# Altium PCB PCB1.PcbDoc
Units mil, origin at the board's own origin, x right, y up, seen from the top; angles counter-clockwise.
Board outline 6000 x 4000 mil, 2 copper layers (Top Layer, Bottom Layer); 53 components, 99 nets, 837 pads, 0 vias.
Unrouted connection lines stored in the file: 465.
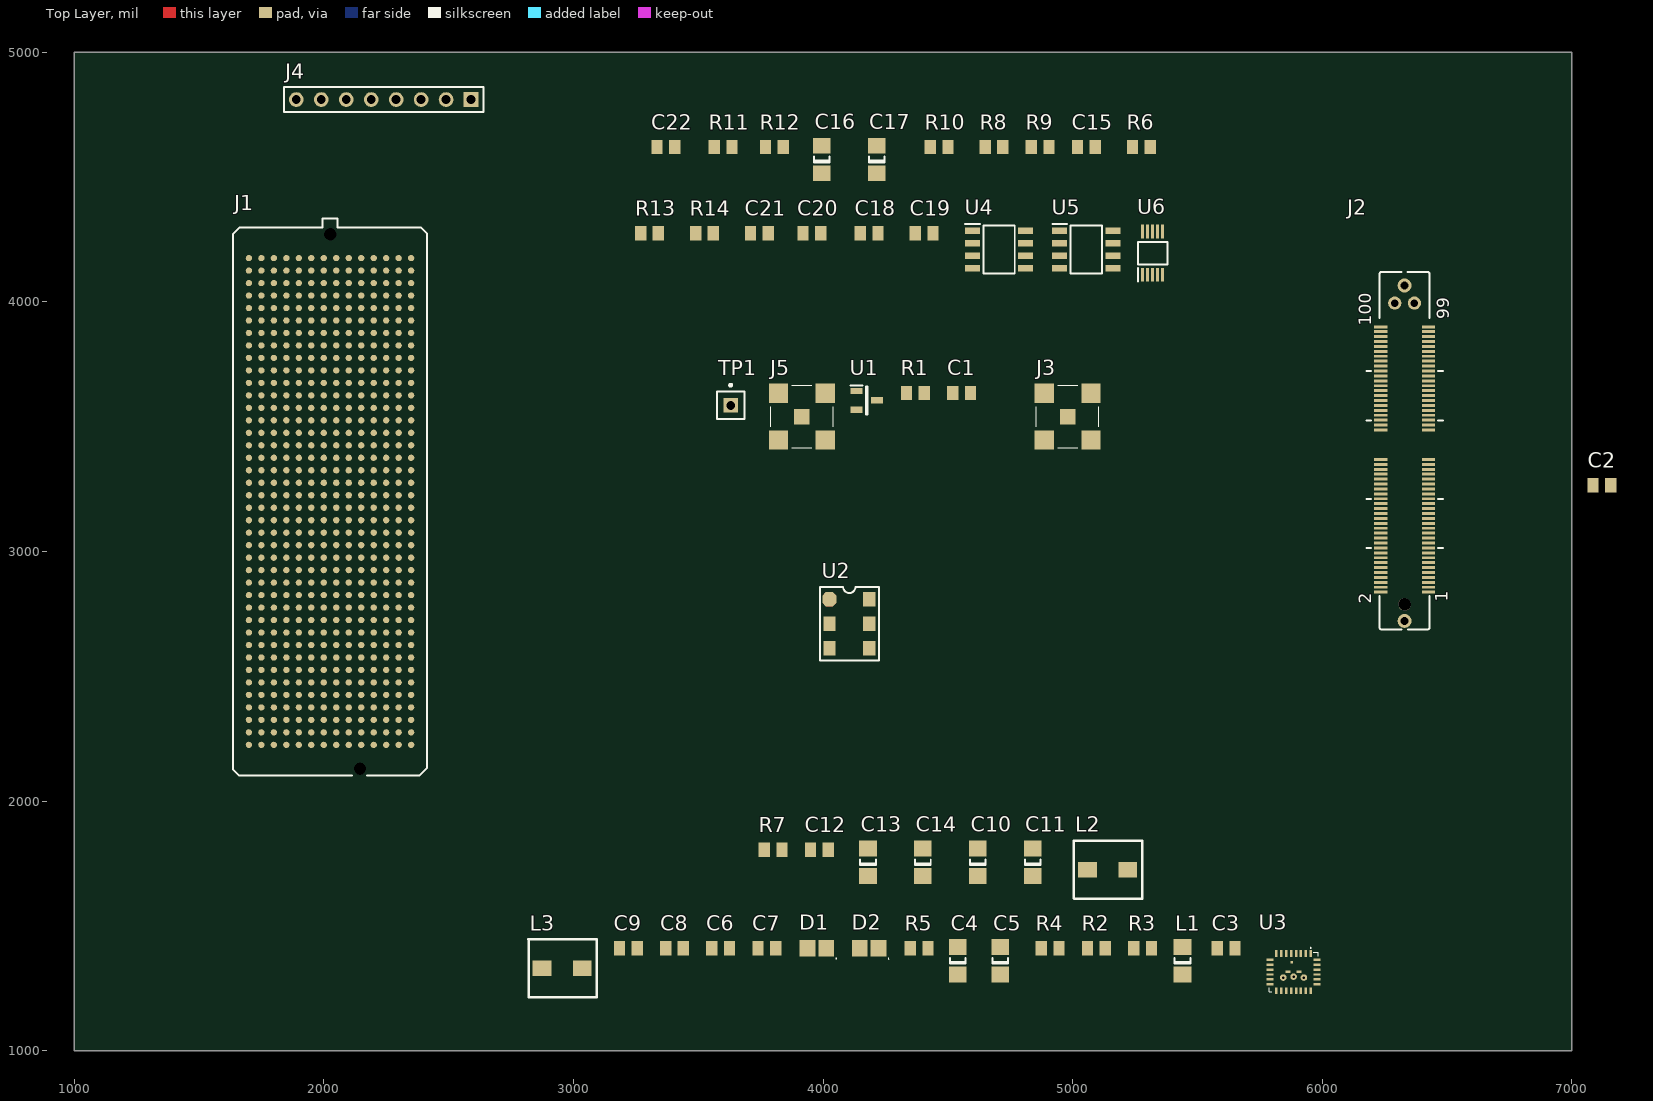
[diagram p0: Top Layer view]
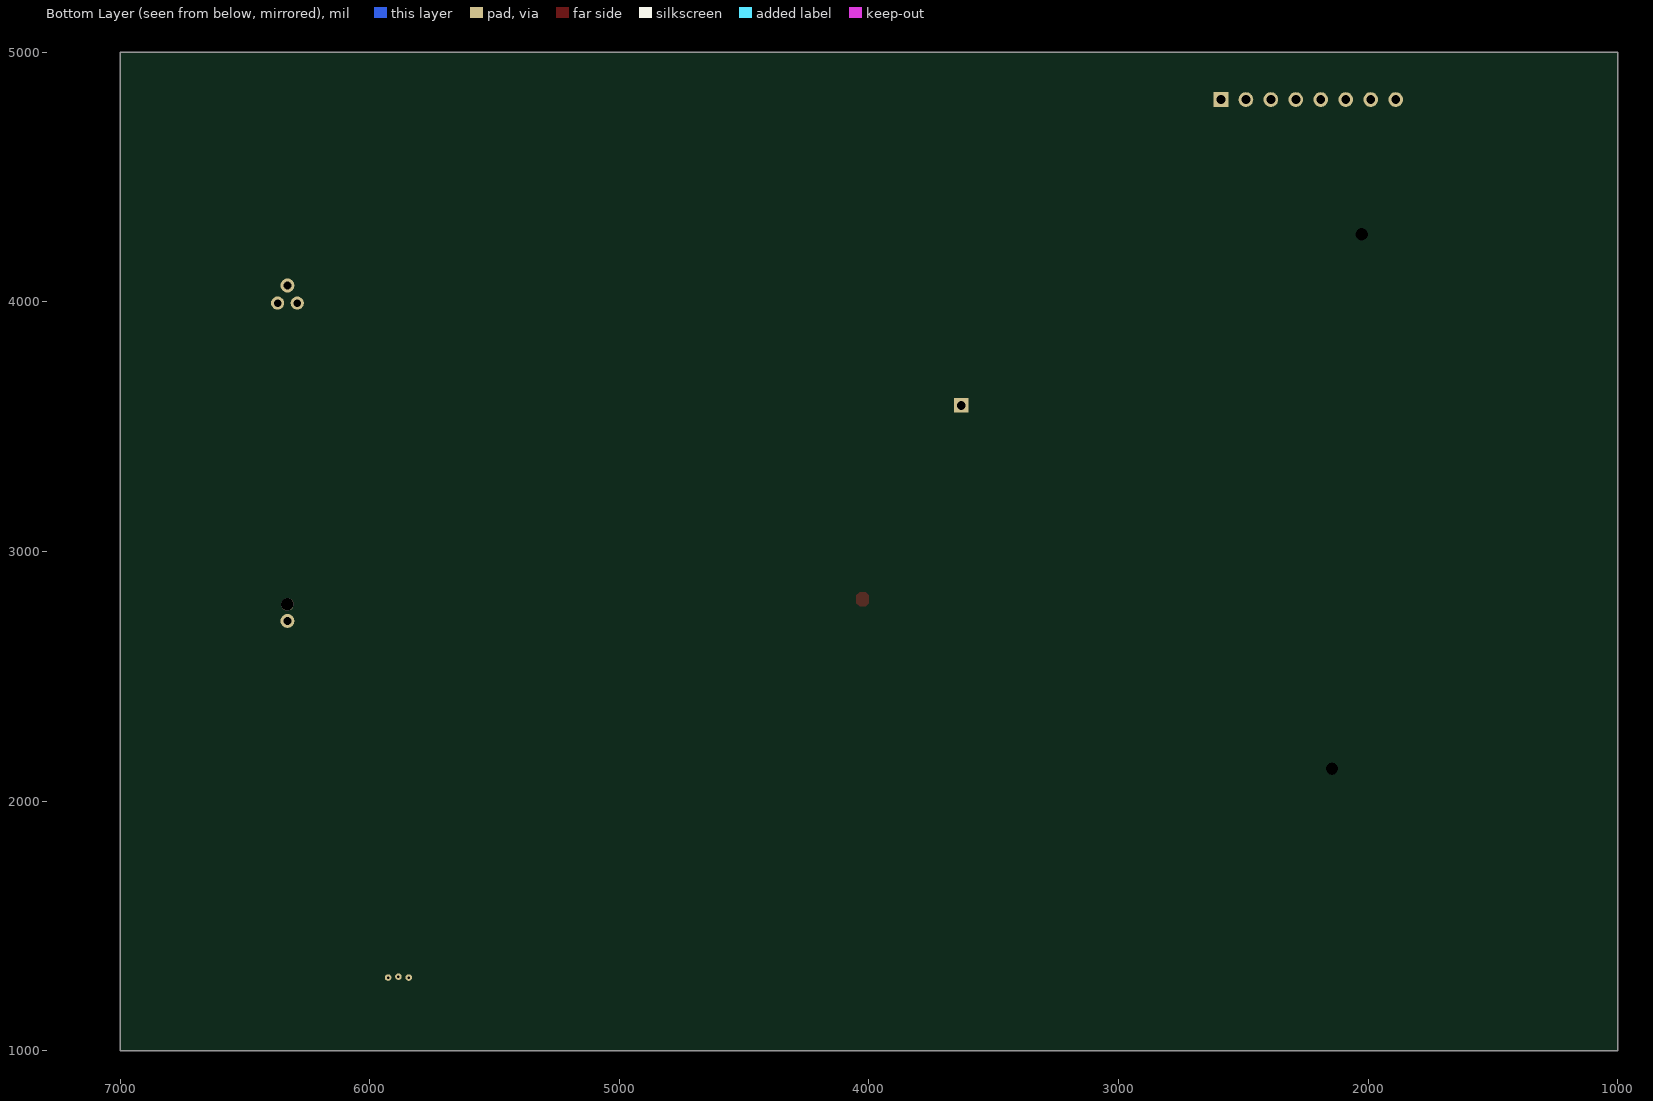
[diagram p1: Bottom Layer view, seen from below]

## Layer stack, top to bottom
Top Solder: solder mask 0.4, Solder Resist, Dk 3.5
Top Layer: signal copper 1.4
Dielectric 1: dielectric 12.6, FR-4, Dk 4.8
Bottom Layer: signal copper 1.4
Bottom Solder: solder mask 0.4, Solder Resist, Dk 3.5

## Board outline
1000,1000 7000,1000 7000,5000 1000,5000

## Design rules (kind name [scope] priority, off if disabled: settings)
Clearance [All] p1: gap=10 ignorepadtopadclearanceinfootprint=FALSE
DiffPairsRouting [All] p1: maxlimit=10 minlimit=10 mostfreqgap=10 toplayer_minwidth=15 toplayer_maxwidth=15 toplayer_prefwidth=15 bottomlayer_minwidth=15 bottomlayer_maxwidth=15 bottomlayer_prefwidth=15 maxuncoupledlength=500
PolygonConnect [All] p1: connectstyle=Relief reliefconductorwidth=10 reliefentries=4 polygonreliefangle="90 Angle" airgapwidth=10
RoutingVias [All] p1: holewidth=28 width=50 viastyle="Through Hole" minholewidth=28 minwidth=50 maxholewidth=28 maxwidth=50
SolderMaskExpansion [All] p1: expansion=4 istentingtop=FALSE
SupplyNets "Schematic Supply Nets_4" [InNet('3V3')] p1: voltage=0.000
SupplyNets "Schematic Supply Nets_3" [InNet('2V5')] p2: voltage=0.000
SupplyNets "Schematic Supply Nets_2" [InNet('GND')] p3: voltage=0.000
SupplyNets "Schematic Supply Nets_1" [InNet('1V5')] p4: voltage=0.000
SupplyNets "Schematic Supply Nets" [InNet('VADJ_FMC')] p5: voltage=0.000
Width [All] p1: maxlimit=10 minlimit=10 preferedwidth=10
29 further rules are at their usual default settings.

## Classes and differential pairs
component class TP4_Compact_FMC_Sht2: C3 C4 C5 C6 C7 C8 C9 C10 C11 C12 C13 C14 C15 C16 C17 C18 C19 C20 C21 C22 D1 D2 J2 L1 L2 L3 R2 R3 R4 R5 R6 R7 R8 R9 R10 R11 R12 R13 R14 U3 U4 U5 U6
component class TP4_Compact_FMC_Sht1: C1 C2 J1 J3 J4 J5 R1 TP1 U1 U2
differential pair TPX4_RefClk: +TPX4_RefClk_P -TPX4_RefClk_N
differential pair TO_SYNC_B: +TO_SYNC_B_P -TO_SYNC_B_N
differential pair TESTOUT_T: +TESTOUT_T_P -TESTOUT_T_N
differential pair TESTOUT_B: +TESTOUT_B_P -TESTOUT_B_N
differential pair SHUTTER_B: +SHUTTER_B_P -SHUTTER_B_N
differential pair SERIAL_OUT5_T: +SERIAL_OUT5_T_P -SERIAL_OUT5_T_N
differential pair SERIAL_OUT5_B: +SERIAL_OUT5_B_P -SERIAL_OUT5_B_N
differential pair SERIAL_OUT4_T: +SERIAL_OUT4_T_P -SERIAL_OUT4_T_N
differential pair SERIAL_OUT4_B: +SERIAL_OUT4_B_P -SERIAL_OUT4_B_N
differential pair SERIAL_OUT3_T: +SERIAL_OUT3_T_P -SERIAL_OUT3_T_N
differential pair SERIAL_OUT3_B: +SERIAL_OUT3_B_P -SERIAL_OUT3_B_N
differential pair SERIAL_OUT2_T: +SERIAL_OUT2_T_P -SERIAL_OUT2_T_N
differential pair SERIAL_OUT2_B: +SERIAL_OUT2_B_P -SERIAL_OUT2_B_N
differential pair SERIAL_OUT1_T: +SERIAL_OUT1_T_P -SERIAL_OUT1_T_N
differential pair SERIAL_OUT1_B: +SERIAL_OUT1_B_P -SERIAL_OUT1_B_N
differential pair SERIAL_OUT0_T: +SERIAL_OUT0_T_P -SERIAL_OUT0_T_N
differential pair SERIAL_OUT0_B: +SERIAL_OUT0_B_P -SERIAL_OUT0_B_N
differential pair SC_DATA_OUT_B: +SC_DATA_OUT_B_P -SC_DATA_OUT_B_N
differential pair SC_DATA_IN_B: +SC_DATA_IN_B_P -SC_DATA_IN_B_N
differential pair SC_CLOCK_OUT_B: +SC_CLOCK_OUT_B_P -SC_CLOCK_OUT_B_N
differential pair SC_CLOCK_IN_B: +SC_CLOCK_IN_B_P -SC_CLOCK_IN_B_N
differential pair RESET_B: +RESET_B_P -RESET_B_N
differential pair MGTREF: +MGTREF_P -MGTREF_N

## Components (designator, comment, footprint, x,y, rotation, side; value= is the part's Value field where it differs from the comment)
C1 "Cap" CAP0805 4555,3635 r0 top value="10uF 16v 0805"
C2 "Cap" CAP0805 7120,3265 r0 top value="10uF 16v 0805"
C3 "Cap" CAP0805 5615,1410 r0 top value="10uF 16v 0805"
C4 "Cap" 1206 4540,1360 r90 top value="47uF 25v 1206"
C5 "Cap" 1206 4710,1360 r90 top value="47uF 25v 1206"
C6 "Cap" CAP0805 3590,1410 r0 top value=DNP
C7 "Cap" CAP0805 3775,1410 r0 top value=DNP
C8 "Cap" CAP0805 3405,1410 r0 top value="0.1uF 16v 0805"
C9 "Cap" CAP0805 3220,1410 r0 top value="0.1uF 16v 0805"
C10 "Cap" 1206 4620,1755 r90 top value="47uF 25v 1206"
C11 "Cap" 1206 4840,1755 r90 top value="47uF 25v 1206"
C12 "Cap" CAP0805 3985,1805 r0 top value="22pF 0805"
C13 "Cap" 1206 4180,1755 r90 top value="47uF 25v 1206"
C14 "Cap" 1206 4400,1755 r90 top value="47uF 25v 1206"
C15 "Cap" CAP0805 5055,4620 r0 top value="22pF 0805"
C16 "Cap" 1206 3995,4570 r90 top value="47uF 25v 1206"
C17 "Cap" 1206 4215,4570 r90 top value="47uF 25v 1206"
C18 "Cap" CAP0805 4185,4275 r0 top value="0.1uF 16v 0805"
C19 "Cap" CAP0805 4405,4275 r0 top value="0.1uF 16v 0805"
C20 "Cap" CAP0805 3955,4275 r0 top value="0.1uF 16v 0805"
C21 "Cap" CAP0805 3745,4275 r0 top value="0.1uF 16v 0805"
C22 "Cap" CAP0805 3370,4620 r0 top value="0.1uF 16v 0805"
D1 "LED_GRN 0603" LED0603 3975,1410 r0 top
D2 "LED_GRN 0603" LED0603 4185,1410 r0 top
J1 "ASP_184330_01" SAMTEC_ASP_184330_01 2025,3200 r90 top
J2 "MEC5-050-01-L-DV-W1-K-TR" MEC5-050-01-L-DV-W1-K-TR 6329.65,3368.33 r90 top
J3 "SMA_V" SMA_Vert 4980,3540 r0 top
J4 "Header 8" HDR1X8 2590,4810 r180 top
J5 "SMA_V" SMA_Vert 3915,3540 r0 top
L1 "Inductor Iron" 1206 5440,1360 r90 top value="bead 1206"
L2 "Wurth 744316033" Inductor_5.6mm 5140,1725 r0 top value=330nH
L3 "Wurth 744316033" Inductor_5.6mm 2955,1330 r0 top value=330nH
R1 "Res" CAP0805 4370,3635 r0 top value=zero
R2 "Res1" CAP0805 5095,1410 r0 top value=15k
R3 "Res1" CAP0805 5280,1410 r0 top value=15k
R4 "Res1" CAP0805 4910,1410 r0 top value=150k
R5 "Res1" CAP0805 4385,1410 r0 top value=zero
R6 "Res1" CAP0805 5275,4620 r0 top value=45.3k
R7 "Res1" CAP0805 3800,1805 r0 top value=15k
R8 "Res1" CAP0805 4685,4620 r0 top value=10k
R9 "Res1" CAP0805 4870,4620 r0 top value=10k
R10 "Res1" CAP0805 4465,4620 r0 top value=zero
R11 "Res" CAP0805 3600,4620 r0 top value=".02 1W 1206"
R12 "Res" CAP0805 3805,4620 r0 top value=".02 1W 1206"
R13 "Res1" CAP0805 3305,4275 r0 top value=zero
R14 "Res1" CAP0805 3525,4275 r0 top value=zero
TP1 "through-hole pad" Pin1 3630,3585 r0 top
U1 "MCP1700T-2502E_TT" SOT95P237X112-3N 4175,3605 r0 top
U2 "SIT9365AI-2E2-25E160.00" osc_7mm_5mm 4025.55,2808.43 r0 top
U3 "LTC3636EUFD#PBF" LTC3636EUFDPBF 5885,1315 r0 top
U4 "AD8202WYRZ" SOIC127P600X175-8N 4705,4210 r0 top
U5 "AD8202WYRZ" SOIC127P600X175-8N 5055,4210 r0 top
U6 "ADS1015LIDGSR" SOP50P490X110-10N 5320,4195 r90 top

## Footprints (in the part's own frame and the unit in brackets; to place one, negate y for a bottom-side part, rotate by r counter-clockwise, add the part's x,y. Pads: shape width x height; smd on the part's side, far side on the other; paste and mask are expansions set on the pad)
1206 [mm] "Chip Capacitor; Body 3.2 x 1.6 mm (LxW typ)"
  rect 1.6x1.8 smd: 1(-1.4,0) 2(1.4,0)
  silkscreen extent -0.3,-0.8 0.3,0.8
CAP0805 [mm]
  rect 1.15x1.45 smd: 1(-0.9,0) 2(0.9,0)
  body extent -1.08,-0.7 1.07,0.7, height 1
HDR1X8 [mm]
  rect 1.5x1.5 hole 0.9: 1(0,0)
  round 1.5 hole 0.9: 2(2.54,0) 3(5.08,0) 4(7.62,0) 5(10.16,0) 6(12.7,0) 7(15.24,0) 8(17.78,0)
  silkscreen extent -1.27,-1.27 19.05,1.27
Inductor_5.6mm [mm]
  rect 1.9x1.6 smd: 1(-2.05,0) 2(2.05,0)
  silkscreen extent -3.43,-2.95 3.51,2.95
LED0603 [mm]
  rect 1.6x1.65 smd: 1(-0.95,0) 2(0.95,0)
  silkscreen extent 1.91,-1.09 2.01,-0.99, body extent -1.35,-0.8 1.35,0.8, height 1
LTC3636EUFDPBF [mm]
  rect 0.25x0.7 smd: 1(1.75,1.9) 2(1.25,1.9) 3(0.75,1.9) 4(0.25,1.9) 5(-0.25,1.9) 6(-0.75,1.9) 7(-1.25,1.9) 8(-1.75,1.9) 15(-1.75,-1.9) 16(-1.25,-1.9) 17(-0.75,-1.9) 18(-0.25,-1.9) 19(0.25,-1.9) 20(0.75,-1.9) 21(1.25,-1.9) 22(1.75,-1.9)
  rect 0.7x0.25 smd: 9(-2.4,1.25) 10(-2.4,0.75) 11(-2.4,0.25) 12(-2.4,-0.25) 13(-2.4,-0.75) 14(-2.4,-1.25) 23(2.4,-1.25) 24(2.4,-0.75) 25(2.4,-0.25) 26(2.4,0.25) 27(2.4,0.75) 28(2.4,1.25)
  rect 0.23x0.28 smd: 29(-0.19,1)
  rect 0.53x0.25 smd: 30(0.565,0.03) 31(-0.565,0.03)
  round 0.667 hole 0.25: 32(0,-0.47) 33(1.05,-0.56) 34(-1.05,-0.56)
  silkscreen extent -2.5,-2 2.5,2.5, body extent -2.5,-2 2.5,2, height 0.9
MEC5-050-01-L-DV-W1-K-TR [mm]
  rect 0.3x1.35 smd mask+0: 1(-13.5,-2.425) 2(-13.5,2.425) 3(-13,-2.425) 4(-13,2.425) 5(-12.5,-2.425) 6(-12.5,2.425) 7(-12,-2.425) 8(-12,2.425) 9(-11.5,-2.425) 10(-11.5,2.425) 11(-11,-2.425) 12(-11,2.425) 13(-10.5,-2.425) 14(-10.5,2.425) 15(-10,-2.425) 16(-10,2.425) 17(-9.5,-2.425) 18(-9.5,2.425) 19(-9,-2.425) 20(-9,2.425) 21(-8.5,-2.425) 22(-8.5,2.425) 23(-8,-2.425) 24(-8,2.425) 25(-7.5,-2.425) 26(-7.5,2.425) 27(-7,-2.425) 28(-7,2.425) 29(-6.5,-2.425) 30(-6.5,2.425) 31(-6,-2.425) 32(-6,2.425) 33(-5.5,-2.425) 34(-5.5,2.425) 35(-5,-2.425) 36(-5,2.425) 37(-4.5,-2.425) 38(-4.5,2.425) 39(-4,-2.425) 40(-4,2.425) 41(-3.5,-2.425) 42(-3.5,2.425) 43(-3,-2.425) 44(-3,2.425) 45(-2.5,-2.425) 46(-2.5,2.425) 47(-2,-2.425) 48(-2,2.425) 49(-1.5,-2.425) 50(-1.5,2.425) 51(-1,-2.425) 52(-1,2.425) 53(-0.5,-2.425) 54(-0.5,2.425) 55(0,-2.425) 56(0,2.425) 57(3,-2.425) 58(3,2.425) 59(3.5,-2.425) 60(3.5,2.425) 61(4,-2.425) 62(4,2.425) 63(4.5,-2.425) 64(4.5,2.425) 65(5,-2.425) 66(5,2.425) 67(5.5,-2.425) 68(5.5,2.425) 69(6,-2.425) 70(6,2.425) 71(6.5,-2.425) 72(6.5,2.425) 73(7,-2.425) 74(7,2.425) 75(7.5,-2.425) 76(7.5,2.425) 77(8,-2.425) 78(8,2.425) 79(8.5,-2.425) 80(8.5,2.425) 81(9,-2.425) 82(9,2.425) 83(9.5,-2.425) 84(9.5,2.425) 85(10,-2.425) 86(10,2.425) 87(10.5,-2.425) 88(10.5,2.425) 89(11,-2.425) 90(11,2.425) 91(11.5,-2.425) 92(11.5,2.425) 93(12,-2.425) 94(12,2.425) 95(12.5,-2.425) 96(12.5,2.425) 97(13,-2.425) 98(13,2.425) 99(13.5,-2.425) 100(13.5,2.425)
  round 1.43 hole 0.83 mask+0: G1(-16.43,0) G4(17.7,0)
  round 1.35 hole 0.75 mask+0: G2(15.91,1) G3(15.91,-1)
  round 1.27 hole 1.27 unplated: ""(-14.75,0)
  silkscreen extent -17.3,-3.9 19.08,3.9
osc_7mm_5mm [mm]
  oct 1.45x1.45 smd: 1(0,0)
  rect 1.25x1.45 smd: 2(0,-2.5) 3(0,-5) 4(4.05,-5) 5(4.05,-2.5) 6(4.05,0)
  Top Layer region: -0.625,-0.412 -0.312,-0.725 0.312,-0.725 0.625,-0.412 0.625,0.412 0.312,0.725 -0.312,0.725 -0.625,0.412
  silkscreen extent -0.97,-6.25 5.05,1.25
Pin1 [mm]
  rect 1.5x1.5 hole 0.9: 1(0,0)
  silkscreen extent -1.4,-1.4 1.4,2.17
SAMTEC_ASP_184330_01 [mm]
  round 0.64 smd: A1(24.765,5.715) A2(23.495,5.715) A3(22.225,5.715) A4(20.955,5.715) A5(19.685,5.715) A6(18.415,5.715) A7(17.145,5.715) A8(15.875,5.715) A9(14.605,5.715) A10(13.335,5.715) A11(12.065,5.715) A12(10.795,5.715) A13(9.525,5.715) A14(8.255,5.715) A15(6.985,5.715) A16(5.715,5.715) A17(4.445,5.715) A18(3.175,5.715) A19(1.905,5.715) A20(0.635,5.715) A21(-0.635,5.715) A22(-1.905,5.715) A23(-3.175,5.715) A24(-4.445,5.715) A25(-5.715,5.715) A26(-6.985,5.715) A27(-8.255,5.715) A28(-9.525,5.715) A29(-10.795,5.715) A30(-12.065,5.715) A31(-13.335,5.715) A32(-14.605,5.715) A33(-15.875,5.715) A34(-17.145,5.715) A35(-18.415,5.715) A36(-19.685,5.715) A37(-20.955,5.715) A38(-22.225,5.715) A39(-23.495,5.715) A40(-24.765,5.715) B1(24.765,4.445) B2(23.495,4.445) B3(22.225,4.445) B4(20.955,4.445) B5(19.685,4.445) B6(18.415,4.445) B7(17.145,4.445) B8(15.875,4.445) B9(14.605,4.445) B10(13.335,4.445) B11(12.065,4.445) B12(10.795,4.445) B13(9.525,4.445) B14(8.255,4.445) B15(6.985,4.445) B16(5.715,4.445) B17(4.445,4.445) B18(3.175,4.445) B19(1.905,4.445) B20(0.635,4.445) B21(-0.635,4.445) B22(-1.905,4.445) B23(-3.175,4.445) B24(-4.445,4.445) B25(-5.715,4.445) B26(-6.985,4.445) B27(-8.255,4.445) B28(-9.525,4.445) B29(-10.795,4.445) B30(-12.065,4.445) B31(-13.335,4.445) B32(-14.605,4.445) B33(-15.875,4.445) B34(-17.145,4.445) B35(-18.415,4.445) B36(-19.685,4.445) B37(-20.955,4.445) B38(-22.225,4.445) B39(-23.495,4.445) B40(-24.765,4.445) C1(24.765,3.175) C2(23.495,3.175) C3(22.225,3.175) C4(20.955,3.175) C5(19.685,3.175) C6(18.415,3.175) C7(17.145,3.175) C8(15.875,3.175) C9(14.605,3.175) C10(13.335,3.175) C11(12.065,3.175) C12(10.795,3.175) C13(9.525,3.175) C14(8.255,3.175) C15(6.985,3.175) C16(5.715,3.175) C17(4.445,3.175) C18(3.175,3.175) C19(1.905,3.175) C20(0.635,3.175) C21(-0.635,3.175) C22(-1.905,3.175) C23(-3.175,3.175) C24(-4.445,3.175) C25(-5.715,3.175) C26(-6.985,3.175) C27(-8.255,3.175) C28(-9.525,3.175) C29(-10.795,3.175) C30(-12.065,3.175) C31(-13.335,3.175) C32(-14.605,3.175) C33(-15.875,3.175) C34(-17.145,3.175) C35(-18.415,3.175) C36(-19.685,3.175) C37(-20.955,3.175) C38(-22.225,3.175) C39(-23.495,3.175) C40(-24.765,3.175) D1(24.765,1.905) D2(23.495,1.905) D3(22.225,1.905) D4(20.955,1.905) D5(19.685,1.905) D6(18.415,1.905) D7(17.145,1.905) D8(15.875,1.905) D9(14.605,1.905) D10(13.335,1.905) D11(12.065,1.905) D12(10.795,1.905) D13(9.525,1.905) D14(8.255,1.905) D15(6.985,1.905) D16(5.715,1.905) D17(4.445,1.905) D18(3.175,1.905) D19(1.905,1.905) D20(0.635,1.905) D21(-0.635,1.905) D22(-1.905,1.905) D23(-3.175,1.905) D24(-4.445,1.905) D25(-5.715,1.905) D26(-6.985,1.905) D27(-8.255,1.905) D28(-9.525,1.905) D29(-10.795,1.905) D30(-12.065,1.905) D31(-13.335,1.905) D32(-14.605,1.905) D33(-15.875,1.905) D34(-17.145,1.905) D35(-18.415,1.905) D36(-19.685,1.905) D37(-20.955,1.905) D38(-22.225,1.905) D39(-23.495,1.905) D40(-24.765,1.905) E1(24.765,0.635) E2(23.495,0.635) E3(22.225,0.635) E4(20.955,0.635) E5(19.685,0.635) E6(18.415,0.635) E7(17.145,0.635) E8(15.875,0.635) E9(14.605,0.635) E10(13.335,0.635) E11(12.065,0.635) E12(10.795,0.635) E13(9.525,0.635) E14(8.255,0.635) E15(6.985,0.635) E16(5.715,0.635) E17(4.445,0.635) E18(3.175,0.635) E19(1.905,0.635) E20(0.635,0.635) E21(-0.635,0.635) E22(-1.905,0.635) E23(-3.175,0.635) E24(-4.445,0.635) E25(-5.715,0.635) E26(-6.985,0.635) E27(-8.255,0.635) E28(-9.525,0.635) E29(-10.795,0.635) E30(-12.065,0.635) E31(-13.335,0.635) E32(-14.605,0.635) E33(-15.875,0.635) E34(-17.145,0.635) E35(-18.415,0.635) E36(-19.685,0.635) E37(-20.955,0.635) E38(-22.225,0.635) E39(-23.495,0.635) E40(-24.765,0.635) F1(24.765,-0.635) F2(23.495,-0.635) F3(22.225,-0.635) F4(20.955,-0.635) F5(19.685,-0.635) F6(18.415,-0.635) F7(17.145,-0.635) F8(15.875,-0.635) F9(14.605,-0.635) F10(13.335,-0.635) F11(12.065,-0.635) F12(10.795,-0.635) F13(9.525,-0.635) F14(8.255,-0.635) F15(6.985,-0.635) F16(5.715,-0.635) F17(4.445,-0.635) F18(3.175,-0.635) F19(1.905,-0.635) F20(0.635,-0.635) F21(-0.635,-0.635) F22(-1.905,-0.635) F23(-3.175,-0.635) F24(-4.445,-0.635) F25(-5.715,-0.635) F26(-6.985,-0.635) F27(-8.255,-0.635) F28(-9.525,-0.635) F29(-10.795,-0.635) F30(-12.065,-0.635) F31(-13.335,-0.635) F32(-14.605,-0.635) F33(-15.875,-0.635) F34(-17.145,-0.635) F35(-18.415,-0.635) F36(-19.685,-0.635) F37(-20.955,-0.635) F38(-22.225,-0.635) F39(-23.495,-0.635) F40(-24.765,-0.635) G1(24.765,-1.905) G2(23.495,-1.905) G3(22.225,-1.905) G4(20.955,-1.905) G5(19.685,-1.905) G6(18.415,-1.905) G7(17.145,-1.905) G8(15.875,-1.905) G9(14.605,-1.905) G10(13.335,-1.905) G11(12.065,-1.905) G12(10.795,-1.905) G13(9.525,-1.905) G14(8.255,-1.905) G15(6.985,-1.905) G16(5.715,-1.905) G17(4.445,-1.905) G18(3.175,-1.905) G19(1.905,-1.905) G20(0.635,-1.905) G21(-0.635,-1.905) G22(-1.905,-1.905) G23(-3.175,-1.905) G24(-4.445,-1.905) G25(-5.715,-1.905) G26(-6.985,-1.905) G27(-8.255,-1.905) G28(-9.525,-1.905) G29(-10.795,-1.905) G30(-12.065,-1.905) G31(-13.335,-1.905) G32(-14.605,-1.905) G33(-15.875,-1.905) G34(-17.145,-1.905) G35(-18.415,-1.905) G36(-19.685,-1.905) G37(-20.955,-1.905) G38(-22.225,-1.905) G39(-23.495,-1.905) G40(-24.765,-1.905) H1(24.765,-3.175) H2(23.495,-3.175) H3(22.225,-3.175) H4(20.955,-3.175) H5(19.685,-3.175) H6(18.415,-3.175) H7(17.145,-3.175) H8(15.875,-3.175) H9(14.605,-3.175) H10(13.335,-3.175) H11(12.065,-3.175) H12(10.795,-3.175) H13(9.525,-3.175) H14(8.255,-3.175) H15(6.985,-3.175) H16(5.715,-3.175) H17(4.445,-3.175) H18(3.175,-3.175) H19(1.905,-3.175) H20(0.635,-3.175) H21(-0.635,-3.175) H22(-1.905,-3.175) H23(-3.175,-3.175) H24(-4.445,-3.175) H25(-5.715,-3.175) H26(-6.985,-3.175) H27(-8.255,-3.175) H28(-9.525,-3.175) H29(-10.795,-3.175) H30(-12.065,-3.175) H31(-13.335,-3.175) H32(-14.605,-3.175) H33(-15.875,-3.175) H34(-17.145,-3.175) H35(-18.415,-3.175) H36(-19.685,-3.175) H37(-20.955,-3.175) H38(-22.225,-3.175) H39(-23.495,-3.175) H40(-24.765,-3.175) J1(24.765,-4.445) J2(23.495,-4.445) J3(22.225,-4.445) J4(20.955,-4.445) J5(19.685,-4.445) J6(18.415,-4.445) J7(17.145,-4.445) J8(15.875,-4.445) J9(14.605,-4.445) J10(13.335,-4.445) J11(12.065,-4.445) J12(10.795,-4.445) J13(9.525,-4.445) J14(8.255,-4.445) J15(6.985,-4.445) J16(5.715,-4.445) J17(4.445,-4.445) J18(3.175,-4.445) J19(1.905,-4.445) J20(0.635,-4.445) J21(-0.635,-4.445) J22(-1.905,-4.445) J23(-3.175,-4.445) J24(-4.445,-4.445) J25(-5.715,-4.445) J26(-6.985,-4.445) J27(-8.255,-4.445) J28(-9.525,-4.445) J29(-10.795,-4.445) J30(-12.065,-4.445) J31(-13.335,-4.445) J32(-14.605,-4.445) J33(-15.875,-4.445) J34(-17.145,-4.445) J35(-18.415,-4.445) J36(-19.685,-4.445) J37(-20.955,-4.445) J38(-22.225,-4.445) J39(-23.495,-4.445) J40(-24.765,-4.445) K1(24.765,-5.715) K2(23.495,-5.715) K3(22.225,-5.715) K4(20.955,-5.715) K5(19.685,-5.715) K6(18.415,-5.715) K7(17.145,-5.715) K8(15.875,-5.715) K9(14.605,-5.715) K10(13.335,-5.715) K11(12.065,-5.715) K12(10.795,-5.715) K13(9.525,-5.715) K14(8.255,-5.715) K15(6.985,-5.715) K16(5.715,-5.715) K17(4.445,-5.715) K18(3.175,-5.715) K19(1.905,-5.715) K20(0.635,-5.715) K21(-0.635,-5.715) K22(-1.905,-5.715) K23(-3.175,-5.715) K24(-4.445,-5.715) K25(-5.715,-5.715) K26(-6.985,-5.715) K27(-8.255,-5.715) K28(-9.525,-5.715) K29(-10.795,-5.715) K30(-12.065,-5.715) K31(-13.335,-5.715) K32(-14.605,-5.715) K33(-15.875,-5.715) K34(-17.145,-5.715) K35(-18.415,-5.715) K36(-19.685,-5.715) K37(-20.955,-5.715) K38(-22.225,-5.715) K39(-23.495,-5.715) K40(-24.765,-5.715) L1(24.765,-6.985) L2(23.495,-6.985) L3(22.225,-6.985) L4(20.955,-6.985) L5(19.685,-6.985) L6(18.415,-6.985) L7(17.145,-6.985) L8(15.875,-6.985) L9(14.605,-6.985) L10(13.335,-6.985) L11(12.065,-6.985) L12(10.795,-6.985) L13(9.525,-6.985) L14(8.255,-6.985) L15(6.985,-6.985) L16(5.715,-6.985) L17(4.445,-6.985) L18(3.175,-6.985) L19(1.905,-6.985) L20(0.635,-6.985) L21(-0.635,-6.985) L22(-1.905,-6.985) L23(-3.175,-6.985) L24(-4.445,-6.985) L25(-5.715,-6.985) L26(-6.985,-6.985) L27(-8.255,-6.985) L28(-9.525,-6.985) L29(-10.795,-6.985) L30(-12.065,-6.985) L31(-13.335,-6.985) L32(-14.605,-6.985) L33(-15.875,-6.985) L34(-17.145,-6.985) L35(-18.415,-6.985) L36(-19.685,-6.985) L37(-20.955,-6.985) L38(-22.225,-6.985) L39(-23.495,-6.985) l40(-24.765,-6.985) M1(24.765,-8.255) M2(23.495,-8.255) M3(22.225,-8.255) M4(20.955,-8.255) M5(19.685,-8.255) M6(18.415,-8.255) M7(17.145,-8.255) M8(15.875,-8.255) M9(14.605,-8.255) M10(13.335,-8.255) M11(12.065,-8.255) M12(10.795,-8.255) M13(9.525,-8.255) M14(8.255,-8.255) M15(6.985,-8.255) M16(5.715,-8.255) M17(4.445,-8.255) M18(3.175,-8.255) M19(1.905,-8.255) M20(0.635,-8.255) M21(-0.635,-8.255) M22(-1.905,-8.255) M23(-3.175,-8.255) M24(-4.445,-8.255) M25(-5.715,-8.255) M26(-6.985,-8.255) M27(-8.255,-8.255) M28(-9.525,-8.255) M29(-10.795,-8.255) M30(-12.065,-8.255) M31(-13.335,-8.255) M32(-14.605,-8.255) M33(-15.875,-8.255) M34(-17.145,-8.255) M35(-18.415,-8.255) M36(-19.685,-8.255) M37(-20.955,-8.255) M38(-22.225,-8.255) M39(-23.495,-8.255) M40(-24.765,-8.255) Y1(24.765,8.255) Y2(23.495,8.255) Y3(22.225,8.255) Y4(20.955,8.255) Y5(19.685,8.255) Y6(18.415,8.255) Y7(17.145,8.255) Y8(15.875,8.255) Y9(14.605,8.255) Y10(13.335,8.255) Y11(12.065,8.255) Y12(10.795,8.255) Y13(9.525,8.255) Y14(8.255,8.255) Y15(6.985,8.255) Y16(5.715,8.255) Y17(4.445,8.255) Y18(3.175,8.255) Y19(1.905,8.255) Y20(0.635,8.255) Y21(-0.635,8.255) Y22(-1.905,8.255) Y23(-3.175,8.255) Y24(-4.445,8.255) Y25(-5.715,8.255) Y26(-6.985,8.255) Y27(-8.255,8.255) Y28(-9.525,8.255) Y29(-10.795,8.255) Y30(-12.065,8.255) Y31(-13.335,8.255) Y32(-14.605,8.255) Y33(-15.875,8.255) Y34(-17.145,8.255) Y35(-18.415,8.255) Y36(-19.685,8.255) Y37(-20.955,8.255) Y38(-22.225,8.255) Y39(-23.495,8.255) Y40(-24.765,8.255) Z1(24.765,6.985) Z2(23.495,6.985) Z3(22.225,6.985) Z4(20.955,6.985) Z5(19.685,6.985) Z6(18.415,6.985) Z7(17.145,6.985) Z8(15.875,6.985) Z9(14.605,6.985) Z10(13.335,6.985) Z11(12.065,6.985) Z12(10.795,6.985) Z13(9.525,6.985) Z14(8.255,6.985) Z15(6.985,6.985) Z16(5.715,6.985) Z17(4.445,6.985) Z18(3.175,6.985) Z19(1.905,6.985) Z20(0.635,6.985) Z21(-0.635,6.985) Z22(-1.905,6.985) Z23(-3.175,6.985) Z24(-4.445,6.985) Z25(-5.715,6.985) Z26(-6.985,6.985) Z27(-8.255,6.985) Z28(-9.525,6.985) Z29(-10.795,6.985) Z30(-12.065,6.985) Z31(-13.335,6.985) Z32(-14.605,6.985) Z33(-15.875,6.985) Z34(-17.145,6.985) Z35(-18.415,6.985) Z36(-19.685,6.985) Z37(-20.955,6.985) Z38(-22.225,6.985) Z39(-23.495,6.985) Z40(-24.765,6.985)
  round 0.97 hole 1.27 unplated: MH1(-27.19,-3.05) MH2(27.19,0)
  silkscreen extent -27.89,-9.88 28.78,9.88, body extent -27.94,-9.91 28.83,9.91, height 6.1
SMA_Vert [mil] "SMA, Jack, SMT, Vertical"
  rect 62x62 smd: 1(0,0)
  rect 77x77 smd: 2(-93.5,-93.5) 2(93.5,93.5) 3(-93.5,93.5) 3(93.5,-93.5)
  silkscreen extent -125,-125 125,125, body extent -125,-125 125,125, height 375
SOIC127P600X175-8N [mm]
  rect 1.525x0.65 smd: 1(-2.712,1.905) 2(-2.712,0.635) 3(-2.712,-0.635) 4(-2.712,-1.905) 5(2.712,-1.905) 6(2.712,-0.635) 7(2.712,0.635) 8(2.712,1.905)
  silkscreen extent -3.47,-2.45 1.6,2.58, body extent -3,-2.45 3,2.45, height 1.75
SOP50P490X110-10N [mm]
  rect 1.4x0.3 smd: 1(-2.2,1) 2(-2.2,0.5) 3(-2.2,0) 4(-2.2,-0.5) 5(-2.2,-1) 6(2.2,-1) 7(2.2,-0.5) 8(2.2,0) 9(2.2,0.5) 10(2.2,1)
  silkscreen extent -2.9,-1.5 1.15,1.5, body extent -2.46,-1.5 2.46,1.5, height 1.1
SOT95P237X112-3N [mm]
  rect 1.25x0.65 smd: 1(-1.05,0.95) 2(-1.05,-0.95) 3(1.05,0)
  silkscreen extent -1.68,-1.43 0.08,1.53, body extent -1.18,-1.43 1.18,1.43, height 1.12

## Part data
C1 C2: "Capacitor, ceramic SM", CostEach=0, OrderNo=1276-2872-1-ND, Supplier=Digikey
C3 C4 C5 C6 C7 C8 C9 C10 C11 C12 C13 C14 C15 C16 C17 C18 C19 C20 C21 C22: "Capacitor", LatestRevisionDate=17-Jul-2002, LatestRevisionNote="Re-released for DXP Platform.", PackageDescription="Radial Cap, Thru-Hole; 2 Leads; 0.3 in Pin Spacing", PackageReference=RAD-0.3, Published=8-Jun-2000, Publisher="Altium Limited"
  C3: OrderNo=1276-2872-1-ND
  C4 C5 C10 C11 C13 C14 C16 C17: OrderNo=445-8047-1-ND
  C8 C9 C18 C19 C20 C21 C22: CostEach=0, OrderNo=399-C0805C104K4RACTUCT-ND, Supplier=Digikey
  C12 C15: OrderNo=399-C0805C220J5GACTUCT-ND
D1 D2: library part LED2, "Red LED, SM", EM_PN=L62301CT-ND, OrderNo=L62305CT-ND, Supplier=Digikey
J1: library part FMCplus, CostEach=0, OrderNo=SAM9173-ND, Supplier=Digikey
J2: package=None, Availability=Unavailable, MF=Samtec, MP=MEC5-050-01-L-DV-W1-K-TR, Price=None
J3 J5: library part COAX-F, "Vertical mount SMA", PackageDocument=04-Jul-1999, ComponentLink1Description="Manufacturer Link", ComponentLink1URL=http://www.amphenolrf.com/, DatasheetDocument=30-May-2003, DrillSize="Corresponds to nominal value.", LatestRevisionDate=15-Jul-2004, LatestRevisionNote="Component Replaced.", OrderNo=SAM10718-ND, PackageReference=919-119J-51AX, PCB_Layout="Complies with manufacturer's recommendation.", Published=15-Jul-2004, Publisher="Altium Limited"
J4: "Header, 8-Pin", LatestRevisionDate=17-Jul-2002, LatestRevisionNote="Re-released for DXP Platform.", Publisher="Altium Limited"
L1: "Magnetic-Core Inductor", LatestRevisionDate=17-Jul-2002, LatestRevisionNote="Re-released for DXP Platform.", PackageDescription="Axial Device, Thru-Hole; 2 Leads; 0.9 in Pin Spacing", PackageReference=AXIAL-0.9, Published=24-Mar-1999, Publisher="Altium Limited"
L2 L3: library part "Inductor Iron", "Magnetic-Core Inductor", LatestRevisionDate=17-Jul-2002, LatestRevisionNote="Re-released for DXP Platform.", OrderNo="DK 732-6173-1-ND", PackageDescription="Axial Device, Thru-Hole; 2 Leads; 0.9 in Pin Spacing", PackageReference=AXIAL-0.9, Published=24-Mar-1999, Publisher="Altium Limited"
R1: library part Res3, "Resistor", CostEach=0, LatestRevisionDate=29-May-2009, LatestRevisionNote="IPC-7351 Footprint Added.", OrderNo=P0.0GCT, PackageDescription="Chip Resistor", PackageReference=J1-0603, Published=8-Jun-2000, Publisher="Altium Limited", Supplier=Digikey
R2 R3 R4 R5 R6 R7 R8 R9 R10 R13 R14: "Resistor", LatestRevisionDate=17-Jul-2002, LatestRevisionNote="Re-released for DXP Platform.", PackageDescription="Axial Device, Thru-Hole; 2 Leads; 0.3 in Pin Spacing", PackageReference=AXIAL-0.3, Published=8-Jun-2000, Publisher="Altium Limited"
R11 R12: "Resistor, SM", CostEach=0, OrderNo=RHM.003ALCT-ND, Supplier=Digikey
TP1: library part testpoint, EM_PN=DNP, Supplier=Digikey
U1: "Integrated Circuit", Arrow Part Number=MCP1700T-2502E/TT, Manufacturer_Name=Microchip, Mouser Part Number=579-MCP1700T2502E/TT, Arrow Price/Stock=https://www.arrow.com/en/products/mcp1700t-2502ett/microchip-technology?utm_currency=USD&region=nac, Datasheet Link=https://datasheet.datasheetarchive.com/originals/distributors/Datasheets-DGA25/1767215.pdf, Height=1.12mm, Manufacturer_Part_Number=MCP1700T-2502E/TT, Mouser Price/Stock=https://www.mouser.co.uk/ProductDetail/Microchip-Technology/MCP1700T-2502E-TT?qs=fM4xO01eazNo%2FPEFFkh6Nw%3D%3D, OrderNo=MCP1700T-2502E/TTCT-ND
U2: library part CCLD-033-50-100.000, OrderNo=1473-SIT9365AI-2E2-25E160.000000-ND, Supplier=Digikey
U3: "Integrated Circuit", Manufacturer_Name="Analog Devices", Mouser Part Number=584-LTC3636EUFDPBF, Arrow Part Number=LTC3636EUFD#PBF, Arrow Price/Stock=https://www.arrow.com/en/products/ltc3636eufdpbf/analog-devices?region=nac, Datasheet Link=https://www.arrow.com/en/products/ltc3636eufdpbf/analog-devices, Height=0.8mm, Manufacturer_Part_Number=LTC3636EUFD#PBF, Mouser Price/Stock=https://www.mouser.co.uk/ProductDetail/Analog-Devices/LTC3636EUFDPBF?qs=BZBei1rCqCAF%252BjKW6tHubg%3D%3D
U4 U5: "Integrated Circuit", Manufacturer_Name="Analog Devices", Mouser Part Number=584-AD8202WYRZ, Arrow Part Number=AD8202WYRZ, Arrow Price/Stock=https://www.arrow.com/en/products/ad8202wyrz/analog-devices?region=nac, Datasheet Link=http://www.analog.com/static/imported-files/data_sheets/AD8202.pdf, Height=1.75mm, Manufacturer_Part_Number=AD8202WYRZ, Mouser Price/Stock=https://www.mouser.com/Search/Refine.aspx?Keyword=584-AD8202WYRZ, OrderNo=AD8202YRZ-R7CT-ND, Supplier=Digikey
U6: "Integrated Circuit", Manufacturer_Name="Texas Instruments", Mouser Part Number=595-ADS1015LIDGSR, Arrow Part Number=ADS1015LIDGSR, Arrow Price/Stock=https://www.arrow.com/en/products/ads1015lidgsr/texas-instruments?utm_currency=USD&region=nac, Datasheet Link=https://www.ti.com/lit/ds/symlink/ads1015l.pdf?ts=1755949738915&ref_url=https%253A%252F%252Fwww.google.com%252F, Height=1.1mm, Manufacturer_Part_Number=ADS1015LIDGSR, Mouser Price/Stock=https://www.mouser.co.uk/ProductDetail/Texas-Instruments/ADS1015LIDGSR?qs=2wMNvWM5ZX4Z9D3W5OO6Eg%3D%3D

## Nets (pads, with @x,y where several pads share a name; then routed paths per layer and width w, separated by ;. In a path a pad name is that pad's centre, name@x,y a point inside that pad or via, vN(x,y) a via of type N, cw(c..) or ccw(c..) an arc to the next point about the centre after c; other vN are vias at no path point)
1V5: C12.2 C13.2 C14.2 L3.2 R7.2 R11.2 R12.2 U4.8 U5.8
1V5AN: C16.2 R11.1 U4.1
1V5DIG: C17.2 J2.77 J2.83 R12.1 U5.1
2V5: C2.1 C22.2 U1.2 U2.6 U6.8
3V3: C1.1 C10.2 C11.2 C15.2 C18.2 C19.2 J2.59 L2.1 R6.2 U1.3 U4.6 U5.6
12V0RAW: J1.C35 J1.C37 J1.L36 J1.L37 J1.l40 L1.2 R2.2 R3.2
DIGITALPIXEL0_B: J1.D26 J2.80
DIGITALPIXEL0_T: J1.D23 J2.74
DIGITALPIXEL1_B: J1.D27 J2.82
DIGITALPIXEL1_T: J1.D24 J2.76
GND: C1.2 C2.2 C3.1 C4.1 C5.1 C6.2 C7.1 C10.1 C11.1 C13.1 C14.1 C16.1 C17.1 C18.1 C19.1 C20.1 C21.1 C22.1 D1.2 D2.2 J1.A1 J1.A4 J1.A5 J1.A8 J1.A9 J1.A12 J1.A13 J1.A16 J1.A17 J1.A20 J1.A21 J1.A24 J1.A25 J1.A28 J1.A29 J1.A32 J1.A33 J1.A36 J1.A37 J1.A40 J1.B2 J1.B3 J1.B6 J1.B7 J1.B10 J1.B11 J1.B14 J1.B15 J1.B18 J1.B19 J1.B22 J1.B23 J1.B26 J1.B27 J1.B30 J1.B31 J1.B34 J1.B35 J1.B38 J1.B39 J1.C1 J1.C4 J1.C5 J1.C8 J1.C9 J1.C12 J1.C13 J1.C16 J1.C17 J1.C20 J1.C21 J1.C24 J1.C25 J1.C28 J1.C29 J1.C32 J1.C33 J1.C36 J1.C38 J1.C40 J1.D2 J1.D3 J1.D6 J1.D7 J1.D10 J1.D13 J1.D16 J1.D19 J1.D22 J1.D25 J1.D28 J1.D37 J1.D39 J1.E1 J1.E4 J1.E5 J1.E8 J1.E11 J1.E14 J1.E17 J1.E20 J1.E23 J1.E26 J1.E29 J1.E32 J1.E35 J1.E38 J1.E40 J1.F2 J1.F3 J1.F6 J1.F9 J1.F12 J1.F15 J1.F18 J1.F21 J1.F24 J1.F27 J1.F30 J1.F33 J1.F36 J1.F39 J1.G1 J1.G4 J1.G5 J1.G8 J1.G11 J1.G14 J1.G17 J1.G20 J1.G23 J1.G26 J1.G29 J1.G32 J1.G35 J1.G38 J1.G40 J1.H3 J1.H6 J1.H9 J1.H12 J1.H15 J1.H18 J1.H21 J1.H24 J1.H27 J1.H30 J1.H33 J1.H36 J1.H39 J1.J1 J1.J4 J1.J5 J1.J8 J1.J11 J1.J14 J1.J17 J1.J20 J1.J23 J1.J26 J1.J29 J1.J32 J1.J35 J1.J38 J1.J40 J1.K2 J1.K3 J1.K6 J1.K9 J1.K12 J1.K15 J1.K18 J1.K21 J1.K24 J1.K27 J1.K30 J1.K33 J1.K36 J1.K39 J1.L2 J1.L3 J1.L6 J1.L7 J1.L10 J1.L11 J1.L14 J1.L15 J1.L18 J1.L19 J1.L22 J1.L23 J1.L26 J1.L27 J1.L30 J1.L31 J1.L34 J1.L35 J1.L38 J1.L39 J1.M1 J1.M4 J1.M5 J1.M8 J1.M9 J1.M12 J1.M13 J1.M16 J1.M17 J1.M20 J1.M21 J1.M24 J1.M25 J1.M28 J1.M29 J1.M32 J1.M33 J1.M36 J1.M37 J1.M40 J1.Y1 J1.Y4 J1.Y5 J1.Y8 J1.Y9 J1.Y12 J1.Y13 J1.Y16 J1.Y17 J1.Y20 J1.Y21 J1.Y24 J1.Y25 J1.Y28 J1.Y29 J1.Y32 J1.Y33 J1.Y36 J1.Y37 J1.Y40 J1.Z2 J1.Z3 J1.Z6 J1.Z7 J1.Z10 J1.Z11 J1.Z14 J1.Z15 J1.Z18 J1.Z19 J1.Z22 J1.Z23 J1.Z26 J1.Z27 J1.Z30 J1.Z31 J1.Z34 J1.Z35 J1.Z38 J1.Z39 J2.1 J2.2 J2.7 J2.8 J2.13 J2.14 J2.19 J2.20 J2.25 J2.26 J2.31 J2.32 J2.37 J2.38 J2.43 J2.44 J2.49 J2.50 J2.55 J2.56 J2.60 J2.65 J2.66 J2.72 J3.2 J3.3 J5.2 J5.3 R1.1 R4.1 R5.1 R8.1 R10.1 R13.1 R14.1 TP1.1 U1.1 U2.1 U2.3 U3.12 U3.18 U3.19 U3.25 U3.30 U3.31 U3.32 U4.2 U5.2 U6.1 U6.3
I2C_SCL: J1.C30 J2.85 U6.10
I2C_SDA: J1.C31 J2.86 U6.9
IMON1V5AN: U4.5 U6.5
IMON1V5DIG: U5.5 U6.4
INTVCC: C3.2 U3.1 U3.5 U3.8 U3.29
MGTREF_N: J1.B21 U2.5
MGTREF_P: J1.B20 U2.4
NetC4_2: C4.2 C5.2 L1.1 U3.15 U3.16 U3.21 U3.22
NetC6_1: C6.1 U3.11
NetC7_2: C7.2 U3.26
NetC8_1: C8.1 L3.1 U3.20 U3.24 U3.33
NetC8_2: C8.2 U3.23
NetC9_1: C9.1 L2.2 U3.13 U3.17 U3.34
NetC9_2: C9.2 U3.14
NetC12_1: C12.1 R7.1 R9.2 U3.28
NetC15_1: C15.1 R6.1 R8.2 U3.9
NetC20_2: C20.2 U4.3 U4.4
NetC21_2: C21.2 U5.3 U5.4
NetJ1_d30: J1.D30 J1.D31
NetJ1_h2: J1.H2 R1.2
NetJ2_78: J2.78 J2.84
NetR4_2: R4.2 U3.4
NetR5_2: R5.2 U3.3
NetR9_1: R9.1 R10.2
NetR13_2: R13.2 U6.6
NetR14_2: R14.2 U6.7
PGOOD1: D1.1 R2.1 U3.27
PGOOD2: D2.1 R3.1 U3.10
PWR_EN: U3.2 U3.7
RESET_B_N: J1.D12 J2.75
RESET_B_P: J1.D11 J2.73
SC_CLOCK_IN_B_N: J1.C27 J2.63
SC_CLOCK_IN_B_P: J1.C26 J2.61
SC_CLOCK_OUT_B_N: J1.D18 J2.64
SC_CLOCK_OUT_B_P: J1.D17 J2.62
SC_DATA_IN_B_N: J1.D21 J2.70
SC_DATA_IN_B_P: J1.D20 J2.68
SC_DATA_OUT_B_N: J1.D9 J2.69
SC_DATA_OUT_B_P: J1.D8 J2.67
SERIAL_OUT0_B_N: J1.B17 J2.29
SERIAL_OUT0_B_P: J1.B16 J2.27
SERIAL_OUT0_T_N: J1.C7 J2.5
SERIAL_OUT0_T_P: J1.C6 J2.3
SERIAL_OUT1_B_N: J1.B13 J2.24
SERIAL_OUT1_B_P: J1.B12 J2.22
SERIAL_OUT1_T_N: J1.A3 J2.11
SERIAL_OUT1_T_P: J1.A2 J2.9
SERIAL_OUT2_B_N: J1.B9 J2.35
SERIAL_OUT2_B_P: J1.B8 J2.33
SERIAL_OUT2_T_N: J1.A7 J2.6
SERIAL_OUT2_T_P: J1.A6 J2.4
SERIAL_OUT3_B_N: J1.B5 J2.23
SERIAL_OUT3_B_P: J1.B4 J2.21
SERIAL_OUT3_T_N: J1.A11 J2.17
SERIAL_OUT3_T_P: J1.A10 J2.15
SERIAL_OUT4_B_N: J1.Y11 J2.18
SERIAL_OUT4_B_P: J1.Y10 J2.16
SERIAL_OUT4_T_N: J1.A15 J2.12
SERIAL_OUT4_T_P: J1.A14 J2.10
SERIAL_OUT5_B_N: J1.Z13 J2.36
SERIAL_OUT5_B_P: J1.Z12 J2.34
SERIAL_OUT5_T_N: J1.A19 J2.30
SERIAL_OUT5_T_P: J1.A18 J2.28
SHUTTER_B_N: J1.C23 J2.42
SHUTTER_B_P: J1.C22 J2.40
SPARE0: J1.G9 J2.46
SPARE1: J1.G10 J2.48
SPARE2: J1.G12 J2.52
SPARE3: J1.G13 J2.54
TESTOUT_B_N: J1.C15 J2.47
TESTOUT_B_P: J1.C14 J2.45
TESTOUT_T_N: J1.C19 J2.53
TESTOUT_T_P: J1.C18 J2.51
TO_SYNC_B_N: J1.D15 J2.81
TO_SYNC_B_P: J1.D14 J2.79
TP0: J1.G15 J4.1
TP1: J1.G16 J4.2
TP2: J1.G18 J4.3
TP3: J1.G19 J4.4
TP4: J1.G21 J4.5
TP5: J1.G22 J4.6
TP6: J1.G24 J4.7
TP7: J1.G25 J4.8
TP8: J1.G27 J3.1
TP9: J1.G28 J5.1
TPX4_RefClk_N: J1.C11 J2.41
TPX4_RefClk_P: J1.C10 J2.39
VADJ_FMC: J1.E39 J1.F40 J1.H40
pads on no net: J1.A22 J1.A23 J1.A26 J1.A27 J1.A30 J1.A31 J1.A34 J1.A35 J1.A38 J1.A39 J1.B1 J1.B24 J1.B25 J1.B28 J1.B29 J1.B32 J1.B33 J1.B36 J1.B37 J1.B40 J1.C2 J1.C3 J1.C34 J1.C39 J1.D1 J1.D4 J1.D5 J1.D29 J1.D32 J1.D33 J1.D34 J1.D35 J1.D36 J1.D38 J1.D40 J1.E2 J1.E3 J1.E6 J1.E7 J1.E9 J1.E10 J1.E12 J1.E13 J1.E15 J1.E16 J1.E18 J1.E19 J1.E21 J1.E22 J1.E24 J1.E25 J1.E27 J1.E28 J1.E30 J1.E31 J1.E33 J1.E34 J1.E36 J1.E37 J1.F1 J1.F4 J1.F5 J1.F7 J1.F8 J1.F10 J1.F11 J1.F13 J1.F14 J1.F16 J1.F17 J1.F19 J1.F20 J1.F22 J1.F23 J1.F25 J1.F26 J1.F28 J1.F29 J1.F31 J1.F32 J1.F34 J1.F35 J1.F37 J1.F38 J1.G2 J1.G3 J1.G6 J1.G7 J1.G30 J1.G31 J1.G33 J1.G34 J1.G36 J1.G37 J1.G39 J1.H1 J1.H4 J1.H5 J1.H7 J1.H8 J1.H10 J1.H11 J1.H13 J1.H14 J1.H16 J1.H17 J1.H19 J1.H20 J1.H22 J1.H23 J1.H25 J1.H26 J1.H28 J1.H29 J1.H31 J1.H32 J1.H34 J1.H35 J1.H37 J1.H38 J1.J2 J1.J3 J1.J6 J1.J7 J1.J9 J1.J10 J1.J12 J1.J13 J1.J15 J1.J16 J1.J18 J1.J19 J1.J21 J1.J22 J1.J24 J1.J25 J1.J27 J1.J28 J1.J30 J1.J31 J1.J33 J1.J34 J1.J36 J1.J37 J1.J39 J1.K1 J1.K4 J1.K5 J1.K7 J1.K8 J1.K10 J1.K11 J1.K13 J1.K14 J1.K16 J1.K17 J1.K19 J1.K20 J1.K22 J1.K23 J1.K25 J1.K26 J1.K28 J1.K29 J1.K31 J1.K32 J1.K34 J1.K35 J1.K37 J1.K38 J1.K40 J1.L1 J1.L4 J1.L5 J1.L8 J1.L9 J1.L12 J1.L13 J1.L16 J1.L17 J1.L20 J1.L21 J1.L24 J1.L25 J1.L28 J1.L29 J1.L32 J1.L33 J1.M2 J1.M3 J1.M6 J1.M7 J1.M10 J1.M11 J1.M14 J1.M15 J1.M18 J1.M19 J1.M22 J1.M23 J1.M26 J1.M27 J1.M30 J1.M31 J1.M34 J1.M35 J1.M38 J1.M39 J1.MH1 J1.MH2 J1.Y2 J1.Y3 J1.Y6 J1.Y7 J1.Y14 J1.Y15 J1.Y18 J1.Y19 J1.Y22 J1.Y23 J1.Y26 J1.Y27 J1.Y30 J1.Y31 J1.Y34 J1.Y35 J1.Y38 J1.Y39 J1.Z1 J1.Z4 J1.Z5 J1.Z8 J1.Z9 J1.Z16 J1.Z17 J1.Z20 J1.Z21 J1.Z24 J1.Z25 J1.Z28 J1.Z29 J1.Z32 J1.Z33 J1.Z36 J1.Z37 J1.Z40 J2. J2.57 J2.58 J2.71 J2.87 J2.88 J2.89 J2.90 J2.91 J2.92 J2.93 J2.94 J2.95 J2.96 J2.97 J2.98 J2.99 J2.100 J2.G1 J2.G2 J2.G3 J2.G4 U2.2 U3.6 U4.7 U5.7 U6.2

## Text inside footprints (layer, text, board x,y; h text height)
J2: Top Overlay "1" at 6503.31,2797.5 h50 r90; Top Overlay "2" at 6195.91,2789.94 h50 r90; Top Overlay "99" at 6508.35,3929.07 h50 r90; Top Overlay "100" at 6195.91,3904.07 h50 r90; Mechanical 13 "2.300" at 6485.83,2583.92 h10 r90; Mechanical 13 "4.600" at 6368.23,2647.66 h10 r90; Mechanical 13 "4.850" at 6348.07,2579.63 h10 r90; Mechanical 13 "1.680" at 6183.46,2591.48 h10 r90; Mechanical 13 "1" at 6502.68,2797.93 h50 r90; Mechanical 13 "2" at 6197.05,2788.52 h50 r90; Mechanical 13 "1.250" at 6511.61,2903.76 h10 r90; Mechanical 13 "0.500" at 6190.55,2902.58 h10 r90; Mechanical 13 "13.500" at 6533.07,3049.86 h10 r90; Mechanical 13 "22.000" at 6159.65,3202.62 h10 r90; Mechanical 13 "27.000" at 6562.99,3336.28 h10 r90; Mechanical 13 "35.380" at 6064.17,3336.28 h10 r90; Mechanical 13 "34.130" at 6100,3336.28 h10 r90; Mechanical 13 "30.660" at 6135.83,3337.46 h10 r90; Mechanical 13 "3.000" at 6179.92,3532.7 h10 r90; Mechanical 13 "99" at 6509.69,3927.5 h50 r90; Mechanical 13 "100" at 6196.93,3904.86 h50 r90; Mechanical 13 "2.420" at 6453.15,4152.19 h10 r90; Mechanical 13 "2.000" at 6254.65,4159.35 h10 r90